# Altium PCB MD045B_PCB.PcbDoc (part 2 of 3)
Units mm, origin at the board's own origin, x right, y up, seen from the top; angles counter-clockwise.
Board outline 82.8 x 63.09 mm, 4 copper layers (Top Layer, Ground, Power, Bottom Layer), stack 1.707 mm thick; 146 components, 68 nets, 333 pads, 309 vias.
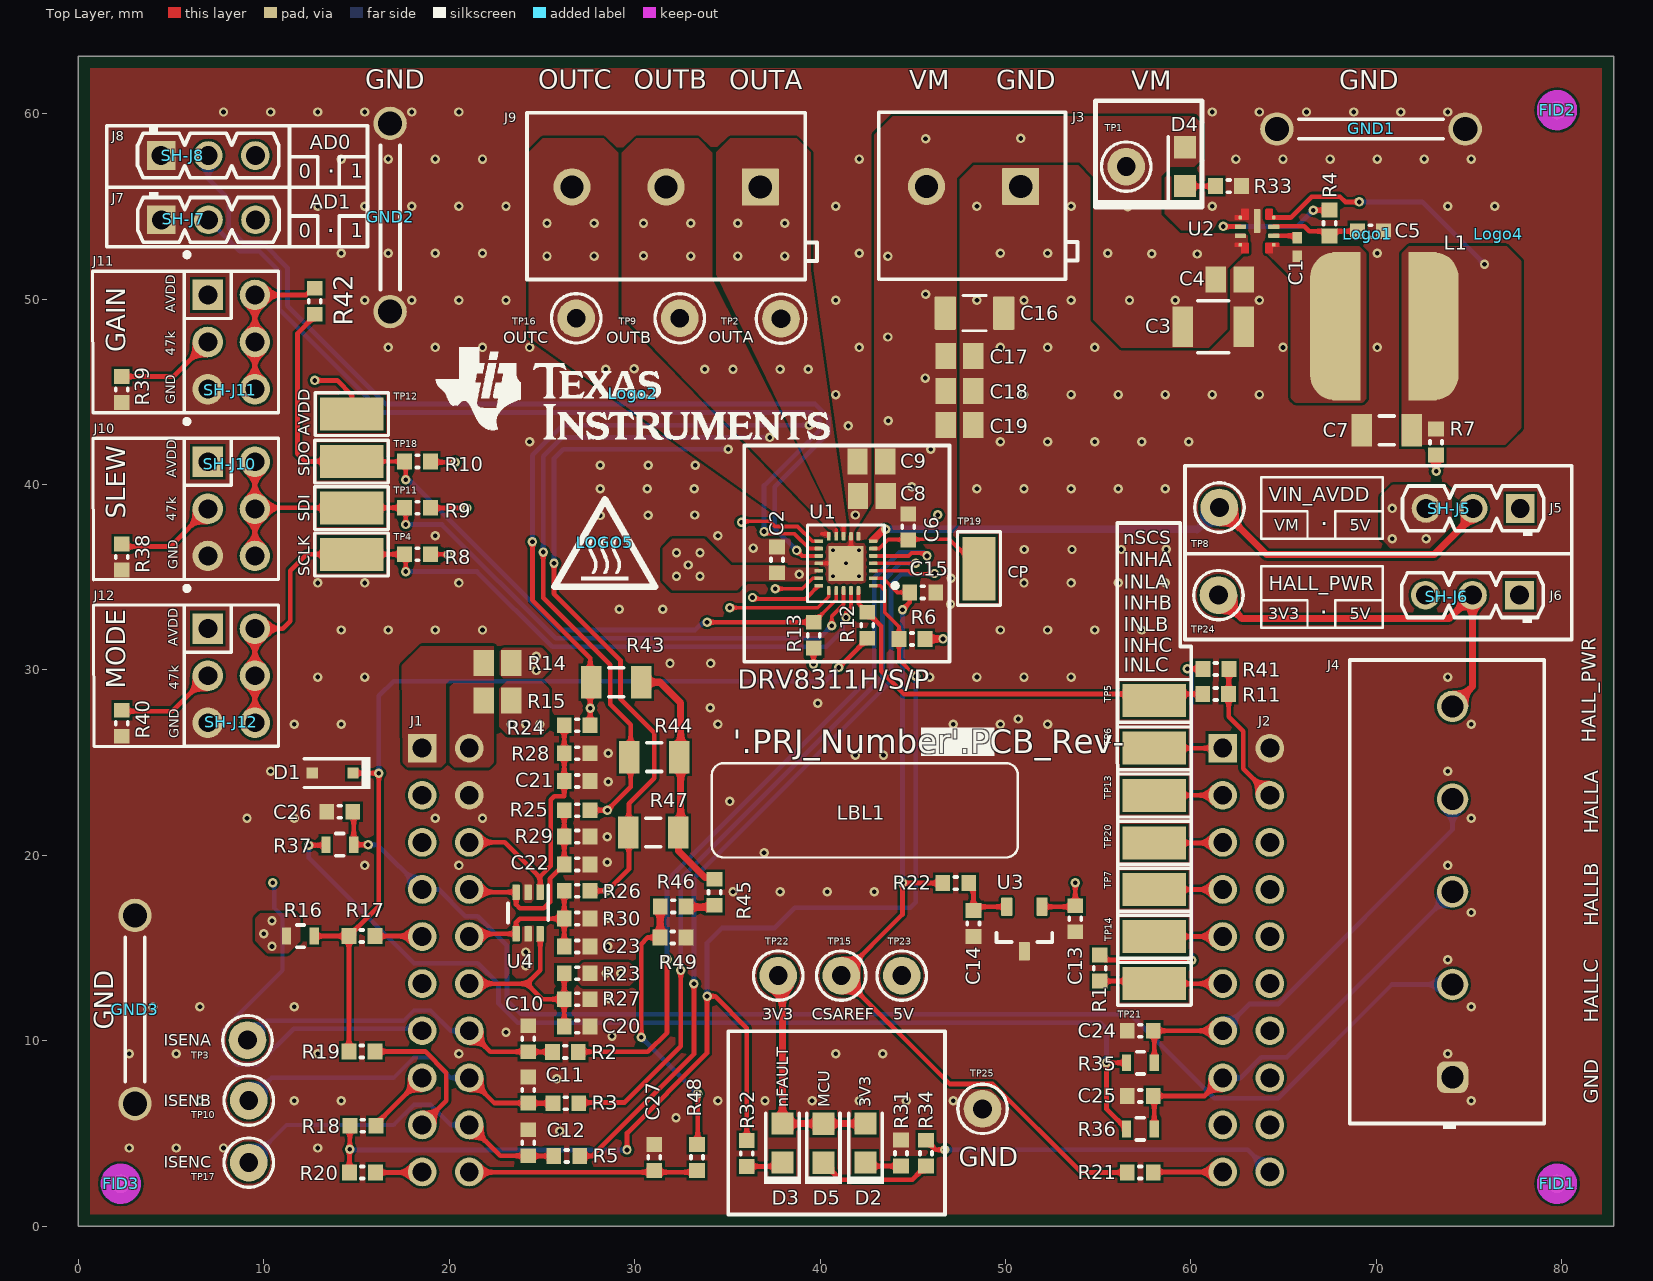
[diagram p0: Top Layer view]

## Part data (continued)
R1 R7 R8 R9 R10 R11 R12 R17 R18 R19 R20 R21 R22 R41 R45 R48: library part CMP-0025874-4, "RES, 0, 5%, 0.1 W, AEC-Q200 Grade 0, 0603", Manufacturer=Panasonic, Power_W=100mW, Supplier Part Number 1=P0.0GCT-ND, TempCo="600 ppm/C", Tolerance_%=5%, Value2=0.1W, Value_Code=0000, ValueDisplayed=0, AEC Category=Q200, AEC Grade=0, AEC Qualified=Y, ComponentLink1Description="Datasheet link", ComponentLink1URL=https://industrial.panasonic.com/cdbs/www-data/pdf/RDA0000/AOA0000C301.pdf, CompType=Resistor, EIA_Code=E24, MountType=SMT, PackageReference=0603, PartNumber=ERJ-3GEY0R00V, Res_ohm=0, RoHS=Y, SizeArea_mm2=1.28, SizeAreaWB_mm2=4.68, SizeX_mm=1.6, SizeY_mm=0.8, SizeZ_mm=1, Supplier 1=Digi-Key, Supplier 2=Mouser, Supplier 3=Farnell, Supplier Part Number 2=667-ERJ-3GEY0R00V, Supplier Part Number 3=2059527, Technology="Thick Film", Value1=5%, VDC_V=50V
R2 R3 R5 R31 R32 R34: library part CMP-0023033-5, "RES, 330, 1%, 0.1 W, 0603", Manufacturer=Yageo, Power_W=100mW, Supplier Part Number 1=311-330HRCT-ND, TempCo="100 ppm/C", Tolerance_%=1%, Value2=0.1W, Value_Code=330R, ValueDisplayed=330, AEC Category=Q200, AEC Grade=N/A, AEC Qualified=N, ComponentLink1Description="Datasheet link", ComponentLink1URL=http://www.yageo.com/pdf/Pu-RC0603_51_PbFree_L_2.pdf, CompType=Resistor, MountType=SMT, PackageReference=0603, PartNumber=RC0603FR-07330RL, Res_ohm=330, RoHS=Y, SizeArea_mm2=1.28, SizeAreaWB_mm2=4.68, SizeX_mm=1.6, SizeY_mm=0.8, SizeZ_mm=1, Supplier 1=Digi-Key, Supplier 2=Mouser, Supplier 3=Farnell, Supplier Part Number 2=603-RC0603FR-07330RL, Supplier Part Number 3=9238425, Technology="Thick Film", Value1=1%, VDC_V=75V
R4: library part CMP-0021990-4, "RES, 100 k, 1%, 0.1 W, AEC-Q200 Grade 0, 0603", Manufacturer=Vishay-Dale, Power_W=100mW, Supplier Part Number 1=541-100KHCT-ND, TempCo="100 ppm/C", Tolerance_%=1%, Value2=0.1W, Value_Code=100k, AEC Category=Q200, AEC Grade=0, AEC Qualified=Y, ComponentLink1Description="Datasheet link", ComponentLink1URL=http://www.vishay.com/docs/20035/dcrcwe3.pdf, CompType=Resistor, EIA_Code=E96, MountType=SMT, PackageReference=0603, PartNumber=CRCW0603100KFKEA, Res_ohm=100k, RoHS=E, SizeArea_mm2=1.28, SizeX_mm=1.6, SizeY_mm=0.8, SizeZ_mm=1, Supplier 1=Digi-Key, Supplier 2=Newark, Supplier 3=Mouser, Supplier Part Number 2=42K3668, Supplier Part Number 3=71-CRCW0603-100K-E3, Technology="Thick Film", Value1=1%, ValueDisplayed=100k, VDC_V=75V
R6 R13: library part CMP-0025830-4, "RES, 5.1 k, 5%, 0.1 W, AEC-Q200 Grade 0, 0603", Manufacturer=Vishay-Dale, Power_W=100mW, Supplier Part Number 1=541-5.1KGCT-ND, TempCo="200 ppm/C", Tolerance_%=5%, Value2=0.1W, Value_Code=5k10, ValueDisplayed=5.1k, AEC Category=Q200, AEC Grade=0, AEC Qualified=Y, ComponentLink1Description="Datasheet link", ComponentLink1URL=http://www.vishay.com/docs/20035/dcrcwe3.pdf, CompType=Resistor, EIA_Code=E24, MountType=SMT, PackageReference=0603, PartNumber=CRCW06035K10JNEA, Res_ohm=5.1k, RoHS=E, SizeArea_mm2=1.28, SizeX_mm=1.6, SizeY_mm=0.8, SizeZ_mm=1, Supplier 1=Digi-Key, Supplier 2=Newark, Supplier 3=Farnell, Supplier Part Number 2=89M6773, Supplier Part Number 3=1570751, Technology="Thick Film", Value1=5%, VDC_V=75V
R14 R15: library part CMP-0020616-3, "RES, 0, 5%, 0.125 W, AEC-Q200 Grade 0, 0805", Manufacturer=Panasonic, Power_W=125mW, Supplier Part Number 1=P0.0ACT-ND, TempCo="600 ppm/C", Tolerance_%=5%, Value2=0.125W, Value_Code=0000, ValueDisplayed=0, AEC Category=Q200, AEC Grade=0, AEC Qualified=Y, ComponentLink1Description="Datasheet link", ComponentLink1URL=https://industrial.panasonic.com/cdbs/www-data/pdf/RDA0000/AOA0000C301.pdf, CompType=Resistor, EIA_Code=E24, MountType=SMT, PackageReference=0805, PartNumber=ERJ-6GEY0R00V, Res_ohm=0, RoHS=Y, SizeArea_mm2=2.5, SizeAreaWB_mm2=6.75, SizeX_mm=2, SizeY_mm=1.25, SizeZ_mm=1.45, Supplier 1=Digi-Key, Supplier 2=Mouser, Supplier 3=Farnell, Supplier Part Number 2=667-ERJ-6GEY0R00V, Supplier Part Number 3=2057661, Technology="Thick Film", Value1=5%, VDC_V=150V
R16 R35 R36 R37: library part CMP-0025686-1, "RES, 10.0 k, 0.1%, 0.1 W, AEC-Q200 Grade 1, 0603", Manufacturer=Vishay-Dale, Power_W=100mW, Supplier Part Number 1=TNP10.0KAACT-ND, TempCo="25 ppm/C", Tolerance_%=0.1%, Value2=0.1W, Value_Code=10k0, ValueDisplayed=10.0k, AEC Category=Q200, AEC Grade=1, AEC Qualified=Y, ComponentLink1Description="Datasheet link", ComponentLink1URL=http://www.vishay.com/docs/28758/tnpw_e3.pdf, CompType=Resistor, EIA_Code=E192, LatestRevisionDate=2017-03-09, MountType=SMT, PackageReference=0603, PartNumber=TNPW060310K0BEEA, Published=2008-06-26, Publisher="Texas Instruments", Res_ohm=10k, RoHS=Y, SizeArea_mm2=1.36, SizeX_mm=1.6, SizeY_mm=0.85, SizeZ_mm=0.55, Supplier 1=Digi-Key, Supplier 2=Newark, Supplier 3=Mouser, Supplier Part Number 2=26R4218, Supplier Part Number 3=71-TNPW060310K0BEEA, Technology="Thin Film", U/M=EA, Value1=0.1%, VDC_V=75V
R23 R24 R25 R26 R46: library part CMP-0022589-4, "RES, 75.0 k, 1%, 0.1 W, AEC-Q200 Grade 0, 0603", Manufacturer=Vishay-Dale, Power_W=100mW, Supplier Part Number 1=541-75.0KHCT-ND, TempCo="100 ppm/C", Tolerance_%=1%, Value2=0.1W, Value_Code=75k0, ValueDisplayed=75.0k, AEC Category=Q200, AEC Grade=0, AEC Qualified=Y, ComponentLink1Description="Datasheet link", ComponentLink1URL=http://www.vishay.com/docs/20035/dcrcwe3.pdf, CompType=Resistor, EIA_Code=E96, MountType=SMT, PackageReference=0603, PartNumber=CRCW060375K0FKEA, Res_ohm=75k, RoHS=E, SizeArea_mm2=1.28, SizeX_mm=1.6, SizeY_mm=0.8, SizeZ_mm=1, Supplier 1=Digi-Key, Supplier 2=Newark, Supplier 3=Mouser, Supplier Part Number 2=52K8708, Supplier Part Number 3=71-CRCW0603-75K-E3, Technology="Thick Film", Value1=1%, VDC_V=75V
R27 R28 R29 R30 R49: library part CMP-0022000-4, "RES, 10.5 k, 1%, 0.1 W, AEC-Q200 Grade 0, 0603", Manufacturer=Vishay-Dale, Power_W=100mW, Supplier Part Number 1=541-10.5KHCT-ND, TempCo="100 ppm/C", Tolerance_%=1%, Value2=0.1W, Value_Code=10k5, ValueDisplayed=10.5k, AEC Category=Q200, AEC Grade=0, AEC Qualified=Y, ComponentLink1Description="Datasheet link", ComponentLink1URL=http://www.vishay.com/docs/20035/dcrcwe3.pdf, CompType=Resistor, EIA_Code=E96, MountType=SMT, PackageReference=0603, PartNumber=CRCW060310K5FKEA, Res_ohm=10.5k, RoHS=E, SizeArea_mm2=1.28, SizeX_mm=1.6, SizeY_mm=0.8, SizeZ_mm=1, Supplier 1=Digi-Key, Supplier 2=Newark, Supplier 3=Mouser, Supplier Part Number 2=52K8068, Supplier Part Number 3=71-CRCW0603-10.5K-E3, Technology="Thick Film", Value1=1%, VDC_V=75V
R33: library part CMP-0023463-3, "RES, 2.00 k, 0.1%, 0.1 W, 0603", Manufacturer="Susumu Co Ltd", Power_W=100mW, Supplier Part Number 1=RG16P2.0KBCT-ND, TempCo="25 ppm/C", Tolerance_%=0.1%, Value2=0.1W, Value_Code=2k00, ValueDisplayed=2.00k, AEC Category=Q200, AEC Qualified=?, ComponentLink1Description="Datasheet link", ComponentLink1URL=http://www.susumu.co.jp/english/pdf/products-j01-01.pdf, CompType=Resistor, EIA_Code=E192, LatestRevisionDate=2017-03-09, MountType=SMT, PackageReference=0603, PartNumber=RG1608P-202-B-T5, Published=2008-06-26, Publisher="Texas Instruments", Res_ohm=2k, RoHS=Y, SizeArea_mm2=1.28, SizeX_mm=1.6, SizeY_mm=0.8, SizeZ_mm=1, Supplier 1=Digi-Key, Supplier 2=Mouser, Supplier 3=Farnell, Supplier Part Number 2=754-RG1608P-202-B-T5, Supplier Part Number 3=1796946, Technology="Metal Film", U/M=EA, Value1=0.1%, VDC_V=75V
R38 R39 R40: library part CMP-0086186-1, "RES, 47.0 k, 0.5%, 0.15 W, AEC-Q200 Grade 0, 0603", Manufacturer=Vishay/Beyschlag, Power_W=150mW, TempCo="25 ppm/C", Tolerance_%=0.5%, Value2=0.15W, Value_Code=47k0, ValueDisplayed=47.0k, AEC Category=Q200, AEC Grade=0, AEC Qualified=Y, ComponentLink1Description="Datasheet link", ComponentLink1URL=http://www.vishay.com/docs/28760/mcat_pro.pdf, CompType=Resistor, MountType=SMT, PackageReference=0603, PartNumber=MCT0603MD4702DP500, Res_ohm=47k, RoHS=Y, SizeArea_mm2=1.28, SizeAreaWB_mm2=4.68, SizeX_mm=1.6, SizeY_mm=0.8, SizeZ_mm=1, Technology="Thin Film", Value1=0.5%
R42: library part CMP-0023631-3, "RES, 100, 0.1%, 0.1 W, 0603", Manufacturer="Yageo America", Power_W=100mW, TempCo="25 ppm/C", Tolerance_%=0.1%, Value2=0.1W, Value_Code=100R, ValueDisplayed=100, AEC Category=Q200, AEC Qualified=?, ComponentLink1Description="Datasheet link", ComponentLink1URL=http://www.yageo.com/pdf/PYu-RT_1-to-0.05_RoHS_L_3.pdf, CompType=Resistor, EIA_Code=E192, LatestRevisionDate=2017-03-09, MountType=SMT, PackageReference=0603, PartNumber=RT0603BRD07100RL, Published=2008-06-26, Publisher="Texas Instruments", Res_ohm=100, RoHS=Y, SizeArea_mm2=1.28, SizeX_mm=1.6, SizeY_mm=0.8, SizeZ_mm=1, Technology="Thin Film", U/M=EA, Value1=0.1%, VDC_V=75V
R43 R44 R47: library part CMP-0018797-1, "RES, 1.00 k, 0.1%, 0.25 W, 1206", Manufacturer="TE Connectivity", Power_W=250mW, Supplier Part Number 1=A105676-ND, TempCo="15 ppm/C", Tolerance_%=0.1%, Value2=0.25W, Value_Code=1k00, ValueDisplayed=1.00k, AEC Category=Q200, AEC Grade=N/A, AEC Qualified=N, ComponentLink1Description="Datasheet link", ComponentLink1URL=http://www.te.com/commerce/DocumentDelivery/DDEController?Action=srchrtrv&DocNm=1773272&DocType=DS&DocLang=English, CompType=Resistor, EIA_Code=E192, LatestRevisionDate=2017-03-09, MountType=SMT, PackageReference=1206, PartNumber=RP73D2B1K0BTG, Published=2008-06-26, Publisher="Texas Instruments", Res_ohm=1k, RoHS=Y, SizeArea_mm2=5.12, SizeX_mm=3.2, SizeY_mm=1.6, SizeZ_mm=1.35, Supplier 1=Digi-Key, Supplier 2=Newark, Supplier 3=Mouser, Supplier Part Number 2=51R8320, Supplier Part Number 3=279-RP73D2B1K0BTG, Technology="Thin Film", U/M=EA, Value1=0.1%, VDC_V=200V
SH-J5 SH-J6 SH-J7 SH-J8 SH-J10 SH-J11 SH-J12: library part CMP-0003623-3, "Shunt, 100mil, Gold plated, Black", Alternate Manufacturer=3M, Alternate PartNumber=969102-0000-DA, Manufacturer=Samtec, Supplier Part Number 1=SAM8858-ND, ClassName=Shunt, ComponentLink1Description="Datasheet Link", ComponentLink1URL=http://www.samtec.com/ftppub/pdf/SNT.PDF, CompType=Shunt, MountType=N/A, PackageReference=Shunt, PartNumber=SNT-100-BK-G, RoHS=Y, Supplier 1=Digi-Key
TP1 TP2 TP3 TP8 TP9 TP10 TP15 TP16 TP17 TP22 TP23 TP24: library part CMP-0055137-1, "Test Point, Miniature, Red, TH", Color=Red, Manufacturer=Keystone, PartNumber=5000, Supplier Part Number 1=36-5000-ND, CNHeader=FALSE, ComponentLink1Description="Datasheet URL", ComponentLink1URL=http://www.keyelco.com/userAssets/file/M60-2p60.pdf, CompType="Test Point", ContactFinish=Silver, CT=TRUE, Green_EU RoHS=Passed, Green_EU RoHS-2=Incomplete, Green_Lifecycle=Active, Green_REACh=Passed, LatestRevisionDate=26/05/2017, MountType=TH, PackageReference="Red Miniature Testpoint", Publisher="Texas Instruments", RoHS=Y, Supplier 1=Digi-Key, Supplier 2=Mouser, Supplier Part Number 2=534-5000
TP4 TP5 TP6 TP7 TP11 TP12 TP13 TP14 TP18 TP19 TP20 TP21: library part CMP-0055152-1, "Test Point, Miniature, SMT", Manufacturer=Keystone, PartNumber=5015, Supplier Part Number 1=36-5015TR-ND, CNHeader=FALSE, ComponentLink1Description="Datasheet URL", ComponentLink1URL=http://www.keyelco.com/userAssets/store/files/5015.PDF, CompType="Test Point", CT=TRUE, Green_EU RoHS=Passed, Green_EU RoHS-2=Incomplete, Green_Lifecycle=Active, Green_REACh=Passed, LatestRevisionDate=26/05/2017, MountType=SMT, PackageReference=Testpoint_Keystone_Miniature, Publisher="Texas Instruments", RoHS=Y, Supplier 1=Digi-Key, Supplier 2=Mouser, Supplier Part Number 2=534-5015
TP25: library part CMP-0055138-1, "Test Point, Miniature, Black, TH", Color=Black, Manufacturer=Keystone, PartNumber=5001, Supplier Part Number 1=36-5001-ND, CNHeader=FALSE, ComponentLink1Description="Datasheet URL", ComponentLink1URL=http://www.keyelco.com/userAssets/file/M60-2p60.pdf, CompType="Test Point", ContactFinish=Silver, CT=TRUE, Green_EU RoHS=Passed, Green_EU RoHS-2=Incomplete, Green_Lifecycle=Active, Green_REACh=Passed, LatestRevisionDate=26/05/2017, MountType=TH, PackageReference="Black Miniature Testpoint", Publisher="Texas Instruments", RoHS=Y, Supplier 1=Digi-Key, Supplier 2=Mouser, Supplier Part Number 2=534-5001
U1: library part CMP-0092942-1, "Three-Phase PWM Motor Driver", Manufacturer="Texas Instruments", Max Supply Voltage=20V, Min Supply Voltage=3V, Nominal Supply Current=7-9mA, Operating Temperature Range="-40°C to +150°C", Switching Frequency=200kHz, AEC Qualified=No, Datasheet Path=datasheets/IC-DRV8311HRRWR.pdf, helpURL=https://upverter.com/upn/revision/b6dada0ce4924667/, Motor Type="Brushless DC", Number Of Outputs=3, PackageReference=QFN24, Part Number=DRV8311HRRWR, PartNumber=DRV8311HRRWR, RoHS=UNKNOWN, SizeZ_mm=0.9mm, Standoff Height=0mm, TaMax_C=+125°C, TaMin_C=-40°C, TJmax_C=+150°C
U2: library part CMP-0750089-1, "LMR36503/06-Q1 Wide Input 60-V Synchronous, DC-DC Buck Converter, RPE0009A (VQFN-9)", Alternate Manufacturer="Texas Instruments", Alternate PartNumber=LMR36506MSC3RPERQ1, AEC Category=Q200, AEC Qualified=Y, ComponentLink1Description="Datasheet Link", ComponentLink1URL=http://www.ti.com/lit/ds/symlink/lmr36506-q1.pdf, ComponentLink2Description="Product Folder", ComponentLink2URL=http://www.ti.com/product/lmr36506-q1, ComponentLink3Description="Online Datasheet", ComponentLink3URL=http://www.ti.com/product/lmr36506-q1/datasheet, CompType=IC, Manufacturer="Texas Instruments", MountType=SMT, PackageDescription=VQFN-9, PackageReference=RPE0009A, PartNumber=LMR36506MSC3RPETQ1, SizeArea_mm2=4, SizeAreaWB_mm2=9, SizeX_mm=2, SizeY_mm=2, SizeZ_mm=1
U3: library part CMP-0079650-1, "Automotive 20 ppm / degC Max, 100 uA, SOT23-3 Series Voltage Reference, DBZ0003A (SOT-23-3)", Alternate Manufacturer="Texas Instruments", AEC Category=Q200, AEC Qualified=Y, ComponentLink1Description="Datasheet Link", ComponentLink1URL=http://www.ti.com/lit/ds/symlink/ref31-q1.pdf, ComponentLink2Description="Product Folder", ComponentLink2URL=http://www.ti.com/product/ref31-q1, ComponentLink3Description="Online Datasheet", ComponentLink3URL=http://www.ti.com/product/ref31-q1/datasheet, CompType=IC, Manufacturer="Texas Instruments", MountType=SMT, PackageDescription=SOT-23-3, PackageReference=DBZ0003A, PartNumber=REF3130AQDBZRQ1, SizeArea_mm2=7.5, SizeAreaWB_mm2=14, SizeX_mm=2.5, SizeY_mm=3, SizeZ_mm=1.12
U4: library part CMP-0043118-3, "4-Channel ESD Solution for High-Speed Differential Interface, DCK0006A (SOT-SC70-6)", Breakdown Voltage(Min)(V)=9, Differential Capacitance(pF)=0.05, IO Capacitance(Typ)(pF)=0.8, IO Leakage Current(nA)=10, Manufacturer="Texas Instruments", Operating Temperature Range="-40 to 85 C", Rating=Catalog, AEC Category=Q200, AEC Qualified=N, ComponentLink1Description="Datasheet Link", ComponentLink1URL=http://www.ti.com/lit/ds/symlink/tpd4s009.pdf, ComponentLink2Description="Product Folder", ComponentLink2URL=http://www.ti.com/product/tpd4s009, ComponentLink3Description="Online Datasheet", ComponentLink3URL=http://www.ti.com/product/tpd4s009/datasheet, CompType=IC, Eco-Plan="Green (RoHS & no Sb/Br)", MountType=SMT, PackageDescription=SOT-SC70-6, PackageReference=DCK0006A, PartNumber=TPD4S009DCKR, RoHS=Y, SizeArea_mm2=4.2, SizeAreaWB_mm2=9.3, SizeX_mm=2.1, SizeY_mm=2.0, SizeZ_mm=1.1
ZZ1: library part CMP-0003616-3, ClassName=AssemblyNote, CompType=AssemblyNote, Key=AssemblyNoteLabel, LatestRevisionDate=2017-03-09, Publisher="Texas Instruments"
ZZ2: library part CMP-0077236-1, ClassName=AssemblyNote, CompType=AssemblyNote, Key=AssemblyNote, LatestRevisionDate=2017-08-10, Publisher="Texas Instruments"
ZZ3: library part CMP-0077237-1, ClassName=AssemblyNote, CompType=AssemblyNote, Key=AssemblyNote, LatestRevisionDate=2017-08-10, Publisher="Texas Instruments"
ZZ4: library part CMP-0077238-1, ClassName=AssemblyNote, CompType=AssemblyNote, Key=AssemblyNote, LatestRevisionDate=2017-08-10, Publisher="Texas Instruments"

## Via types
v1: diameter 0.508, hole 0.254, Top Layer to Bottom Layer, tented both sides, 303 vias
v2: diameter 0.5, hole 0.2, Top Layer to Bottom Layer, 5 vias
v3: diameter 0.508, hole 0.254, Top Layer to Bottom Layer, tented bottom, 1 vias

## Nets (pads, with @x,y where several pads share a name; then routed paths per layer and width w, separated by ;. In a path a pad name is that pad's centre, name@x,y a point inside that pad or via, vN(x,y) a via of type N, cw(c..) or ccw(c..) an arc to the next point about the centre after c; other vN are vias at no path point)
3V3: C13.1 D2.1 D3.1 D5.1 J6.3 R7.2 R13.1 R14.1 TP22.1 U3.1 | length 17.4
  Top Layer w0.254: v1(39.649,30.302) 39.649,31.161 R13.1@39.665,31.177 ; D2.1@42.418,5.497 D2.1@42.451,5.53 ; U3.1@51.974,17.228 53.724,17.228 C13.1@53.774,17.278 53.772,17.281 v1(53.772,18.517)
  Top Layer w0.381: TP22.1@37.744,13.513 37.973,13.284 D3.1@37.973,5.531 40.176,5.531 D5.1@40.183,5.524 40.189,5.53 D2.1@42.451,5.53 ; R7.2@73.228,41.526 73.233,41.521 v1(73.233,40.716)
  other v1: 24.689,29.972 24.689,30.734
3V3_BK: C7.1 L1.2 R7.1 U2.8 | length 13.3
  Top Layer w0.254: U2.8@64.475,54.405 65.391,54.405 66.515,55.529 68.048,55.529 68.332,55.245 v1(69.088,55.245)
  Bottom Layer w0.254: v1(69.088,55.245) 72.48,55.245 v1(75.844,51.881)
+5V: J5.1 J6.1 R15.2 TP23.1 U4.5
  other v1: 24.13,14.046 24.13,14.783 23.356,27.076 24.13,27.076 24.892,27.076
AVDD: C2.1 J7.3 J8.3 J10.1 J11.1 J12.1 R6.1 R35.2 R36.2 R37.2 TP12.1 U1.17 | length 71.8
  Top Layer w0.2: C2.1@37.681,35.24 C2.1@37.79,35.35
  Top Layer w0.254: v1(12.421,20.549) 13.322,20.549 R37.2@13.347,20.574 ; v1(12.751,45.618) 13.958,45.618 14.747,44.829 TP12.1@14.747,43.815 ; R35.2@56.515,8.814 v1(55.448,8.814) 55.448,6.322 R36.2@56.527,5.243
  Top Layer w0.381: C2.1@37.681,35.24 C2.1@37.874,35.433 ; R6.1@45.658,31.674 v1(46.634,31.674)
  Power w0.381: v1(38.884,35.154) 38.887,35.15 38.887,31.953 39.167,31.674 v1(46.634,31.674)
  Bottom Layer w0.254: v1(12.421,20.549) 12.421,19.863 18.1,14.183 21.538,14.183 22.66,13.061 22.66,12.004 23.694,10.97 55.121,10.97 55.448,10.643 v1(55.448,8.814)
  other v1: 32.258,35.05 33.528,35.05 32.893,35.662 32.258,36.322 33.528,36.322
C_TAP: C27.1 J1.20 R48.2 | length 12.3
  Top Layer w0.254: J1.20@21.082,2.921 21.095,2.908 31.064,2.908 R48.2@33.363,2.908
CP: C6.1 TP19.1 U1.6 | length 6.2
  Top Layer w0.2: U1.6@42.867,36.55 43.197,36.55 43.68,37.033 C6.1@44.374,37.033 ; C6.1@44.755,37.044 46.989,37.044 TP19.1@48.565,35.469
CSAREF: C15.1 R21.1 R22.1 TP15.1 U1.2 | length 46.9
  Top Layer w0.2: U1.2@42.867,34.95 43.416,34.95 44.182,34.184 C15.1@44.842,34.184
  Top Layer w0.254: v1@44.361,18.504 v1@44.45,18.504 ; v1(44.45,18.517) v1@44.45,18.504 ; v1(44.45,33.249) 44.842,33.641 C15.1@44.842,34.184 ; R22.1@46.524,18.404 R22.1@46.624,18.504 v1@44.45,18.504 ; R21.1@56.577,2.896 54.096,2.896 49.324,7.668 46.993,7.668 TP15.1@41.148,13.513 44.45,16.815 v1@44.45,18.504
  Bottom Layer w0.254: v1@44.408,18.576 44.399,18.567 v1(44.45,18.517) v1(44.45,33.249) v1@44.408,33.207
GAIN: J11.2 J11.4 J11.6 R42.2 | length 8.5
  Top Layer w0.254: J11.6@9.52,45.15 J11.4@9.52,47.69 J11.2@9.52,50.23 12.295,50.23 R42.2@12.751,50.686
GND: C2.2 C3.2 C4.2 C5.2 C7.2 C8.2 C9.2 C10.2 C11.2 C12.2 C13.2 C14.2 C15.2 C16.1 C17.2 C18.2 C19.2 C20.2 C21.1 C22.2 C23.2 C24.2 C25.2 C26.2 C27.2 D1.2 GND1.1 GND1.2 GND2.1 GND2.2 GND3.1 GND3.2 J1.4 J2.2 J3.1 J4.1 J7.1 J8.1 J10.5 J11.5 J12.5 R27.1 R28.1 R29.1 R30.1 R31.1 R33.1 R38.1 R39.1 R40.1 R49.1 TP25.1 U1.9 U1.16 U1.25 U2.1 U2.9 U3.3 U4.2 | length 3
  Top Layer w0.2: U1.16@39.937,35.75 v2(41.402,35.75) 41.672,36.02 U1.9@41.672,37.215
  other v1: 2.743,4.216 5.283,4.216 7.823,4.216 12.903,4.216 25.959,5.131 32.233,5.842 6.553,6.756 11.633,6.756 14.173,6.756 34.493,6.756 37.033,6.756 39.573,6.756 42.113,6.756 44.653,6.756 47.193,6.756 75.133,6.756 25.806,7.95 2.743,9.296 5.283,9.296 12.903,9.296 20.523,9.296 40.843,9.296 43.383,9.296 73.863,9.296 28.778,10.236 23.063,10.465 4.013,11.836 6.553,11.836 11.633,11.836 75.133,11.836 28.6,12.268 73.863,14.376 28.55,15.088 28.55,16.612 75.133,16.916 35.306,18.034 37.846,18.032 40.386,18.038 42.926,18.034 15.443,19.456 20.523,19.456 73.863,19.456 28.53,19.634 36.982,20.142 28.53,21.006 9.093,21.996 11.633,21.996 19.253,21.996 21.793,21.996 75.133,21.996 35.128,22.911 28.581,23.978 10.363,24.536 73.863,24.536 41.91,25.399 43.427,25.399 28.575,25.502 11.633,27.076 14.173,27.076 34.493,27.076 47.193,27.076 49.733,27.076 52.273,27.076 75.133,27.076 50.698,27.356 34.087,27.965 39.878,28.201 12.903,29.616 15.443,29.616 45.923,29.616 48.463,29.616 51.003,29.616 53.543,29.616 73.863,29.616 31.909,30.353 34.097,30.353 14.173,32.156 16.713,32.156 19.253,32.156 21.793,32.156 49.733,32.156 52.273,32.156 54.813,32.156 57.353,32.156 29.176,33.274 31.512,33.274 47.041,33.553 12.903,34.696 15.443,34.696 20.523,34.696 51.003,34.696 53.543,34.696 56.083,34.696 58.623,34.696 47.066,34.95 51.024,36.5 53.594,36.5 56.242,36.5 58.674,36.509 36.398,36.576 19.253,37.236 34.493,37.236 28.142,38.332 30.727,38.347 33.251,38.359 46.355,38.361 28.143,39.776 30.683,39.776 33.223,39.776 48.463,39.776 51.003,39.776 53.543,39.776 56.083,39.776 58.623,39.776 28.142,41.046 30.736,41.046 33.271,41.046 24.333,42.316 49.733,42.316 52.273,42.316 54.813,42.316 57.353,42.316 59.893,42.316 41.529,43.162 40.843,44.856 51.003,44.856 53.543,44.856 56.083,44.856 58.623,44.856 61.163,44.856 63.703,44.856 16.713,47.396 19.253,47.396 21.793,47.396 24.333,47.396 42.113,47.396 49.733,47.396 52.273,47.396 54.813,47.396 64.973,47.396 70.053,47.396 15.443,49.936 17.983,49.936 20.523,49.936 23.063,49.936 40.843,49.936 48.463,49.936 51.003,49.936 53.543,49.936 63.703,49.936 14.173,52.476 16.713,52.476 19.253,52.476 21.793,52.476 42.113,52.476 49.733,52.476 52.273,52.476 70.053,52.476 12.903,55.016 15.443,55.016 17.983,55.016 20.523,55.016 23.063,55.016 40.843,55.016 48.463,55.016 53.543,55.016 61.163,55.016 73.863,55.016 76.403,55.016 14.173,57.556 16.713,57.556 19.253,57.556 21.793,57.556 42.113,57.556 62.433,57.556 64.973,57.556 67.513,57.556 70.053,57.556 72.593,57.556 75.133,57.556 7.823,60.096 10.363,60.096 12.903,60.096 15.443,60.096 17.983,60.096 20.523,60.096 61.163,60.096 63.703,60.096 66.243,60.096 68.783,60.096 71.323,60.096 73.863,60.096
  other v2: 40.702,35.05 42.102,35.05 40.702,36.45 42.102,36.45
  other v3: 41.91,38.359
HALL_PWR: J4.5 J6.2 TP24.1 | length 21.2
  Top Layer w0.381: TP24.1@61.491,34.036 62.762,32.765 73.924,32.765 J6.2@75.195,34.036 75.195,29.112 J4.5@74.117,28.034
HALLA: C24.1 J2.13 J4.4 R35.1 | length 24
  Top Layer w0.254: R35.1@58.036,8.805 58.036,10.482 C24.1@57.977,10.541 J2.13@61.722,10.541
  Bottom Layer w0.254: J2.13@61.722,10.541 63.16,11.979 64.718,11.979 74.117,21.378 J4.4@74.117,23.034
HALLB: C25.1 J2.15 J4.3 R36.1 | length 22.5
  Top Layer w0.254: R36.1@58.027,5.243 58.027,6.971 C25.1@57.977,7.021 60.742,7.021 J2.15@61.722,8.001
  Bottom Layer w0.254: J2.15@61.722,8.001 62.704,8.001 63.806,9.103 65.186,9.103 J4.3@74.117,18.034
HALLC: C26.1 J1.7 J4.2 R37.1 | length 71
  Top Layer w0.254: C26.1@14.797,22.352 14.847,22.302 R37.1@14.847,20.574 v1(15.621,20.574)
  Bottom Layer w0.254: v1(15.621,20.574) 16.129,20.574 J1.7@18.542,18.161 19.431,18.161 20.869,16.723 21.538,16.723 23.114,15.147 23.114,12.192 23.882,11.424 56.741,11.424 61.266,6.899 64.718,6.899 70.853,13.034 J4.2@74.117,13.034
INHA/AD0: J2.1 J8.2 TP6.1 U1.15 | length 92
  Top Layer w0.2: v1(38.735,36.449) 39.034,36.15 U1.15@39.937,36.15
  Top Layer w0.254: TP6.1@58.025,25.781 J2.1@61.722,25.781
  Power w0.254: v1(38.735,36.449) 38.226,35.94 38.226,25.879 40.275,23.83 59.771,23.83 J2.1@61.722,25.781
  Bottom Layer w0.254: J8.2@7,57.75 7,56.494 8.112,55.382 8.112,53.82 8.9,53.032 9.942,53.032 11.274,51.699 11.274,49.642 16.571,44.345 39.745,44.345 40.456,43.634 40.456,42.777 37.564,39.885 37.564,37.62 v1(38.735,36.449)
INHB/AD1: J2.5 J7.2 TP20.1 U1.14 | length 91.5
  Top Layer w0.2: v1(36.983,37.465) 37.107,37.341 38.626,37.341 39.417,36.55 U1.14@39.937,36.55
  Top Layer w0.254: TP20.1@58.025,20.67 61.691,20.67 J2.5@61.722,20.701
  Power w0.254: v1(36.983,37.465) 36.983,25.837 39.899,22.922 59.501,22.922 J2.5@61.722,20.701
  Bottom Layer w0.254: J7.2@7.01,54.28 8.712,52.578 9.754,52.578 10.82,51.511 10.82,49.454 16.383,43.891 39.557,43.891 40.002,43.446 40.002,42.965 36.983,39.946 v1(36.983,37.465)